# Altium PCB Fast_Servo.PCBDOC (part 2 of 11)
Units mm, origin at the board's own origin, x right, y up, seen from the top; angles counter-clockwise.
Board outline 162.48 x 100 mm, 6 copper layers (Top, GP1(GND), L3, L4, P3V3, Bot), stack 1.716 mm thick; 668 components, 491 nets, 2308 pads, 1133 vias.
Unrouted connection lines stored in the file: 2.
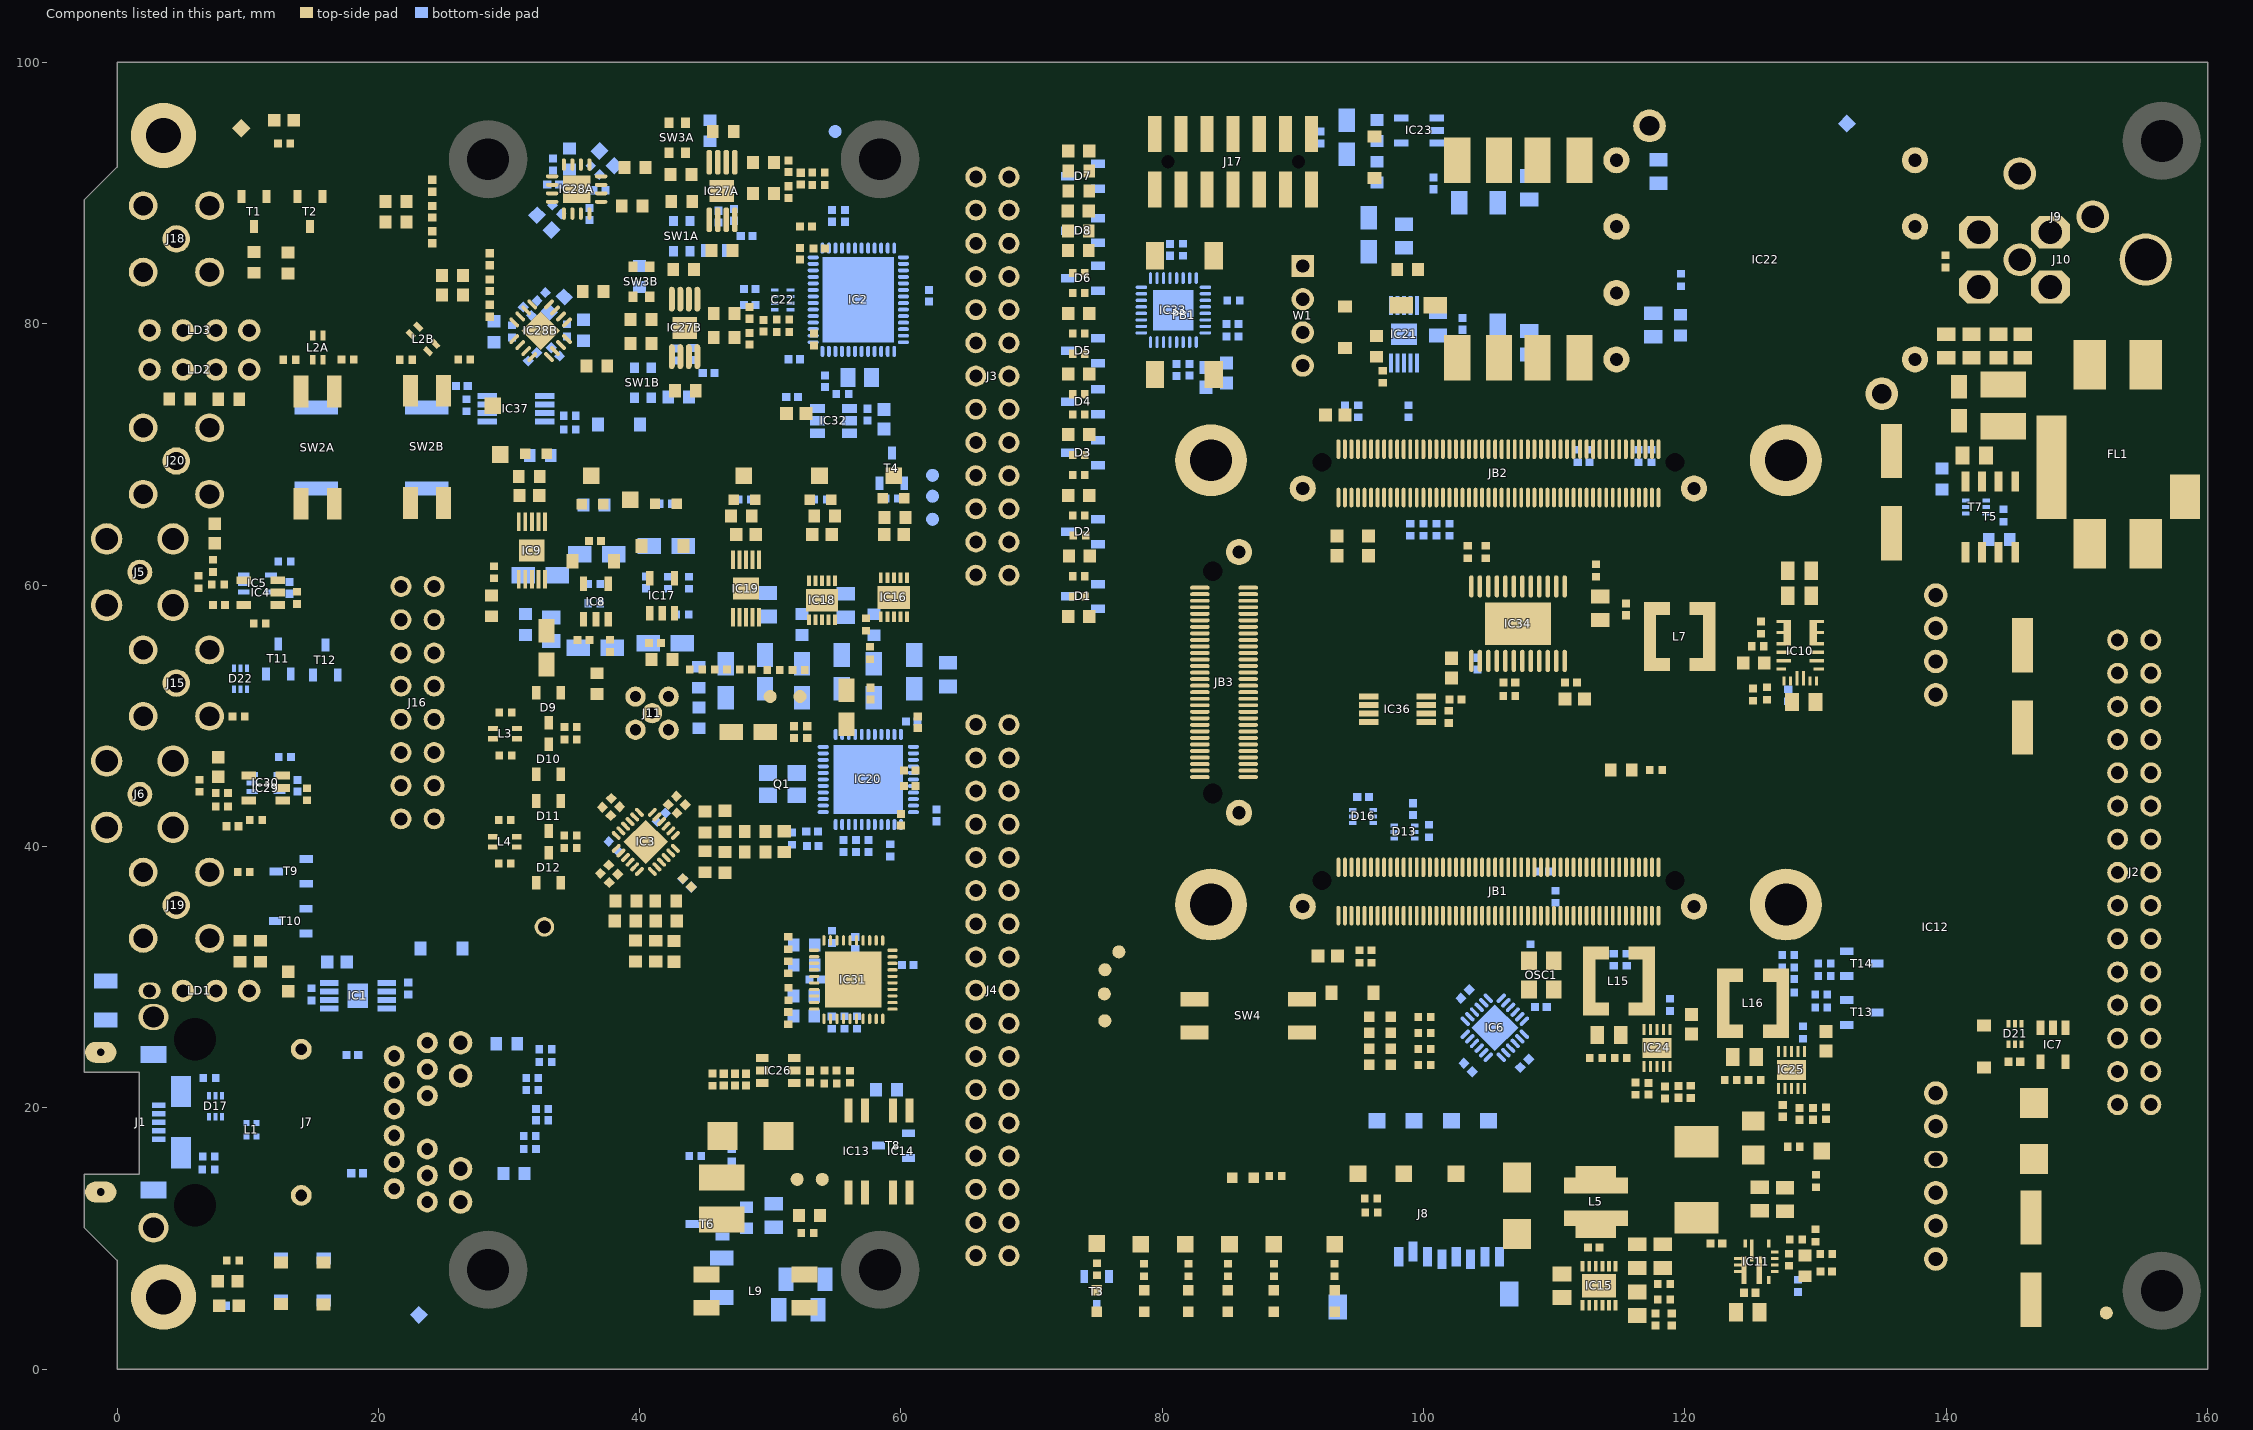
[diagram p6: the components of this part, seen from the top]

## Components (designator, comment, footprint, x,y, rotation, side; value= is the part's Value field where it differs from the comment) (continued)
R148 "20k" RESC1005X40N 47.045,16.358 r270 bottom locked
R149 "10" RESC1005X40N 44.25,16.3 r180 bottom locked
R150 "82k" RESC1608X55N 48.184,11.582 r90 bottom locked
R151 "1k" RESC1005X40N 144.367,65.325 r270 bottom
R152 "10k" RESC1005X40N 101,64.239 r270 bottom locked
R153 "82k" RESC1608X55N 139.672,68.12 r270 bottom
R154 "33k2" RESC1608X55N 144.057,63.5 r180 bottom
R155 "10k" RESC1005X40N 95.1,31.572 r270 top locked
R156 "DNP" RESC1005X40N 96.02,31.579 r90 top locked value=10k
R157 "10k" RESC1005X40N 100.4,41.186 r90 bottom
R158 "1k" RESC1005X40N 100.065,23.276 r0 top locked
R159 "1k" RESC1005X40N 100.065,24.496 r0 top locked
R160 "33" RESC1005X40N 108.175,32.057 r90 bottom locked
R161 "1k" RESC1005X40N 100.065,25.716 r0 top locked
R162 "1k" RESC1005X40N 100.065,26.935 r0 top locked
R164 "18k" RESC1608X55N 57.923,56.968 r270 bottom locked
R165 "10k" RESC1005X40N 43.274,57.737 r180 bottom locked
R166 "62k" RESC1005X40N 42.174,60.185 r90 bottom locked
R167 "20k" RESC1005X40N 43.774,60.185 r270 bottom locked
R169 "33k2" RESC1608X55N 52.422,56.988 r270 bottom locked
R171 "24k9" RESC1608X55N 44.52,52.953 r270 bottom
R172 "10" RESC1005X40N 59.176,39.702 r270 bottom locked
R173 "4k7" RESC1005X40N 93.978,73.306 r270 bottom locked
R174 "4k7" RESC1005X40N 95,73.306 r270 bottom locked
R175 "120k" RESC1608X55N 98.775,84.15 r180 top locked
R176 "Undefined" RESC1608X55N 119.649,79.899 r270 bottom locked
R177 "10k" RESC1005X40N 98.85,73.306 r270 bottom locked
R178 "0" RESC1005X40N 139.95,84.78 r90 top locked
R179 "36k" RESC1005X40N 119.7,83.356 r270 bottom locked
R180 "24k" RESC1608X55N 96.415,94.794 r90 bottom locked
R181 "2k7" RESC1608X55N 96.415,91.61 r90 bottom locked
R182 "20k" RESC1005X40N 115.091,23.803 r180 top
R183 "200k" RESC1005X40N 118.397,5.32 r0 top
R184 "2k" RESC1005X40N 101.975,64.237 r270 bottom locked
R185 "DNP" RESC1005X40N 115.55,31.332 r270 bottom locked value=0
R186 "0" RESC1005X40N 114.55,31.332 r90 bottom locked
R187 "4k7" RESC1005X40N 120.444,21.219 r270 top
R188 "0" RESC1005X40N 129.035,25.753 r270 bottom
R189 "0" RESC1005X40N 9.31,49.96 r180 top
R190 "0" RESC1005X40N 9.698,38.04 r180 top
R191 "24k9" RESC1608X55N 44.532,49.842 r270 bottom
R192 "200k" RESC1005X40N 130.434,28.658 r0 bottom
R193 "49R9" RESC1005X40N 110.1,36.15 r270 bottom
R194 "33" RESC1005X40N 31.775,21.367 r180 bottom
R195 "33" RESC1005X40N 31.775,22.275 r180 bottom
R196 "33" RESC1005X40N 32.535,19.901 r180 bottom
R197 "33" RESC1005X40N 32.535,19.042 r180 bottom
R198 "33" RESC1005X40N 31.595,16.85 r180 bottom
R199 "33" RESC1005X40N 31.59,17.839 r180 bottom
R200 "10k" RESC1005X40N 116.218,21.465 r90 top
R201A "31R6" RESC1608X55N 49.475,89.987 r0 top (schematic designator R201)
R201B "31R6" RESC1608X55N 46.465,78.957 r0 top (schematic designator R201)
R202 "39k" RESC1005X40N 123.51,22.118 r180 top
R203A "31R6" RESC1608X55N 49.475,92.362 r0 top (schematic designator R203)
R203B "31R6" RESC1608X55N 46.465,80.793 r0 top (schematic designator R203)
R204 "36k" RESC1005X40N 125.335,22.118 r180 top
R205 "10k" RESC1005X40N 128.327,17.015 r0 top
R206 "4k7" RESC1005X40N 130.785,19.581 r270 top
R207 "49R9" RESC1005X40N 130.007,10.225 r90 top
R208 "82k" RESC1608X55N 129.179,7.9 r90 top
R209 "Undefined" RESC1608X55N 115.125,45.856 r180 top
R210 "0" RESC1005X40N 117.787,45.856 r180 top
R211 "200k" RESC1005X40N 130.685,31.031 r0 bottom
R212 "2k4" RESC1005X40N 44.32,53.553 r0 top
R213 "20k" RESC1005X40N 46.212,53.527 r0 top
R214 "10k" RESC1005X40N 48.117,53.527 r0 top
R215 "2k4" RESC1005X40N 50.236,53.497 r0 top
R216 "20k" RESC1005X40N 52.166,53.497 r0 top
R217 "2k4" RESC1005X40N 57.324,56.982 r270 top
R218 "10k" RESC1005X40N 57.634,54.805 r270 top
R219 "4k7" RESC1005X40N 28.85,60.989 r270 top
R220 "24k9" RESC1608X55N 28.677,58.411 r270 top
R221 "10k" RESC1005X40N 127.907,29.85 r0 bottom
R222 "10k" RESC1005X40N 127.907,30.721 r0 bottom
R223 "2k4" RESC1005X40N 96.868,75.95 r90 top
R224 "82k" RESC1608X55N 96.393,78.276 r90 top
R225 "49R9" RESC1005X40N 51.669,40.595 r270 bottom
R226 "10k" RESC1005X40N 34.65,71.899 r0 bottom
R227 "0" RESC1005X40N 96.013,11.983 r180 top
R228 "0" RESC1005X40N 34.65,72.966 r0 bottom
R229 "0" RESC1005X40N 95.975,13.049 r180 top
R230 "0" RESC1005X40N 101.923,49.92 r90 top
R231 "0" RESC1005X40N 26.75,73.766 r270 bottom
ST1 "SCHROFF_PANEL_3U_4HP-Stabilizer" "SCHROFF_PANEL_3HP_4U - STABILIZER" 3.556,5.512 r0 top locked
SW1A "AQY221N3M" PANASONIC_AQY22(SON) 43.227,86.717 r90 bottom locked (schematic designator SW1)
SW1B "AQY221N3M" PANASONIC_AQY22(SON) 40.249,75.497 r90 bottom locked (schematic designator SW1)
SW2A "Switch" SW_CTS_204-121ST 15.356,70.531 r270 top locked (schematic designator SW2)
SW2B "Switch" SW_CTS_204-121ST 23.725,70.575 r270 top locked (schematic designator SW2)
SW3A "AQY221N3M" PANASONIC_AQY22(SON) 42.874,94.225 r270 top (schematic designator SW3)
SW3B "AQY221N3M" PANASONIC_AQY22(SON) 40.139,83.214 r270 top (schematic designator SW3)
SW4 "Switch" SW_OMRON_A6SN-2101 86.582,27.027 r0 top locked
T1 "BSH103" SOT95P230X110-3N 10.488,88.581 r270 top locked
T2 "BSH103" SOT95P230X110-3N 14.775,88.581 r270 top locked
T3 "BSH103" SOT95P230X110-3N 74.982,5.933 r270 bottom locked
T4 "BSH103" SOT95P230X110-3N 59.305,68.946 r90 bottom locked
T5 "SI4425DDY-T1-GE3" SOIC127P600X175-8N 143.37,65.225 r270 top
T6 "FDN86246" SOT95P237X112-3N 45.187,11.093 r180 bottom locked
T7 "BC857BV" SOTFL50P160X60-6N 142.275,65.975 r180 bottom
T8 "BSH103" SOT95P230X110-3N 59.425,17.102 r180 bottom
T9 "BSH103" SOT95P230X110-3N 13.335,38.092 r180 bottom
T10 "BSH103" SOT95P230X110-3N 13.3,34.284 r180 bottom
T11 "BSH103" SOT95P230X110-3N 12.346,54.353 r90 bottom
T12 "BSH103" SOT95P230X110-3N 15.95,54.262 r90 bottom
T13 "BSH103" SOT95P230X110-3N 133.535,27.293 r0 bottom
T14 "BSH103" SOT95P230X110-3N 133.535,31.031 r0 bottom
TP1 "Test Point" TPS127 88.529,9.565 r0 top locked
TP2 "Test Point" TPS127 47.978,68.38 r90 top locked
TP3 "Test Point" TPS127 29.344,70 r90 top locked
TP4 "Test Point" TPS127 53.761,68.38 r90 top locked
TP5 "Test Point" TPS127 81.754,9.565 r0 top locked
TP6 "Test Point" TPS127 74.979,9.61 r0 top locked
TP7 "Test Point" TPS127 78.366,9.565 r0 top locked
TP8 "Test Point" TPS127 36.302,68.38 r0 top locked
TP9 "Test Point" TPS127 39.278,66.541 r90 top locked
TP10 "Test Point" TPS127 85.142,9.565 r90 top locked
TP11 "Test Point" TPS127 59.458,68.38 r90 top locked
TP12 "Test Point" TPS127 28.752,73.727 r90 top locked
TP13 "Test Point" TPS127 94.975,14.956 r90 top
TP14 "Plated Hole" c150h100 32.705,33.844 r45 top
TP15 "Test Point" TPS127 98.475,14.956 r0 top
TP16 "Test Point" TPS127 102.475,14.956 r0 top
TP17 "Test Point" TPS127 93.185,9.565 r0 top locked
TP19 "Test Point" TPS127 130.475,16.695 r0 top
TP20 "SMD Pad" C100 49.988,51.475 r270 top locked
TP21 "SMD Pad" C100 52.272,51.475 r270 top locked
TP22 "SMD Pad" C100 75.566,28.714 r90 top
TP23 "SMD Pad" C100 75.614,30.564 r90 top
TP24 "SMD Pad" C100 76.678,31.93 r90 top
TP25 "SMD Pad" C100 62.415,65.04 r90 bottom
TP26 "SMD Pad" C100 54.963,94.721 r90 bottom
TP27 "SMD Pad" C100 62.415,68.404 r90 bottom
TP28 "SMD Pad" C100 62.415,66.804 r90 bottom
TP29 "SMD Pad" C100 75.6,26.656 r90 top
W1 "Header 4" SAMTEC_HTSW-104-23-L-S 90.75,84.42 r270 top locked
WASHER2 "D11.1xd6.6" Keystone_7687 -4.3,69.275 r180 top
WASHER4 "D11.1xd6.6" Keystone_7687 -4.325,52.5 r180 top
WASHER6 "D11.1xd6.6" Keystone_7687 -4.95,35.45 r180 top
WASHER8 "D11.1xd6.6" Keystone_7687 -4.55,86.225 r180 top

## Footprints (in the part's own frame and the unit in brackets; to place one, negate y for a bottom-side part, rotate by r counter-clockwise, add the part's x,y. Pads: shape width x height; smd on the part's side, far side on the other; paste and mask are expansions set on the pad)
3M_N2516-6002RB [mm] "16 Contacts - Straight .100\" x .100\" Low Profile Four-Wall Header"
  round 1.6 hole 1: 1(-8.89,-1.27) 2(-8.89,1.27) 3(-6.35,-1.27) 4(-6.35,1.27) 5(-3.81,-1.27) 6(-3.81,1.27) 7(-1.27,-1.27) 8(-1.27,1.27) 9(1.27,-1.27) 10(1.27,1.27) 11(3.81,-1.27) 12(3.81,1.27) 13(6.35,-1.27) 14(6.35,1.27) 15(8.89,-1.27) 16(8.89,1.27)
  silkscreen extent -13.82,-4.85 13.82,4.52, body extent -13.82,-4.17 13.82,4.52, height 9.65
3M_N2526-6002RB [mm] "26 Contacts - Straight .100\" x .100\" Low Profile Four-Wall Header"
  round 1.6 hole 1: 1(-15.24,-1.27) 2(-15.24,1.27) 3(-12.7,-1.27) 4(-12.7,1.27) 5(-10.16,-1.27) 6(-10.16,1.27) 7(-7.62,-1.27) 8(-7.62,1.27) 9(-5.08,-1.27) 10(-5.08,1.27) 11(-2.54,-1.27) 12(-2.54,1.27) 13(0,-1.27) 14(0,1.27) 15(2.54,-1.27) 16(2.54,1.27) 17(5.08,-1.27) 18(5.08,1.27) 19(7.62,-1.27) 20(7.62,1.27) 21(10.16,-1.27) 22(10.16,1.27) 23(12.7,-1.27) 24(12.7,1.27) 25(15.24,-1.27) 26(15.24,1.27)
  silkscreen extent -20.17,-4.85 20.17,4.52, body extent -20.17,-4.11 20.17,4.52, height 9.91
3M_N2530-6002RB [mm] "30 Contacts - Straight .100\" x .100\" Low Profile Four-Wall Header"
  round 1.6 hole 1: 1(-17.78,-1.27) 2(-17.78,1.27) 3(-15.24,-1.27) 4(-15.24,1.27) 5(-12.7,-1.27) 6(-12.7,1.27) 7(-10.16,-1.27) 8(-10.16,1.27) 9(-7.62,-1.27) 10(-7.62,1.27) 11(-5.08,-1.27) 12(-5.08,1.27) 13(-2.54,-1.27) 14(-2.54,1.27) 15(0,-1.27) 16(0,1.27) 17(2.54,-1.27) 18(2.54,1.27) 19(5.08,-1.27) 20(5.08,1.27) 21(7.62,-1.27) 22(7.62,1.27) 23(10.16,-1.27) 24(10.16,1.27) 25(12.7,-1.27) 26(12.7,1.27) 27(15.24,-1.27) 28(15.24,1.27) 29(17.78,-1.27) 30(17.78,1.27)
  silkscreen extent -22.71,-4.85 22.71,4.52, body extent -22.71,-4.11 22.71,4.52, height 9.91
3M_N2534-6002RB [mm] "34 Contacts - Straight .100\" x .100\" Low Profile Four-Wall Header"
  round 1.6 hole 1: 1(-20.32,-1.27) 2(-20.32,1.27) 3(-17.78,-1.27) 4(-17.78,1.27) 5(-15.24,-1.27) 6(-15.24,1.27) 7(-12.7,-1.27) 8(-12.7,1.27) 9(-10.16,-1.27) 10(-10.16,1.27) 11(-7.62,-1.27) 12(-7.62,1.27) 13(-5.08,-1.27) 14(-5.08,1.27) 15(-2.54,-1.27) 16(-2.54,1.27) 17(0,-1.27) 18(0,1.27) 19(2.54,-1.27) 20(2.54,1.27) 21(5.08,-1.27) 22(5.08,1.27) 23(7.62,-1.27) 24(7.62,1.27) 25(10.16,-1.27) 26(10.16,1.27) 27(12.7,-1.27) 28(12.7,1.27) 29(15.24,-1.27) 30(15.24,1.27) 31(17.78,-1.27) 32(17.78,1.27) 33(20.32,-1.27) 34(20.32,1.27)
  silkscreen extent -25.25,-4.85 25.25,4.52, body extent -25.25,-4.11 25.25,4.52, height 9.91
ADI-UJ-6_M [mm] "SOT23, 6-Leads, Body 2.9x1.6mm, Pitch 0.95mm, IPC Low Density"
  rect 1.15x0.7 smd: 1(-1.225,0.95) 2(-1.225,0) 3(-1.225,-0.95) 4(1.225,-0.95) 5(1.225,0) 6(1.225,0.95)
  silkscreen extent -1.35,-1.45 0.25,1.97, body extent -0.8,-1.45 0.8,1.45, height 1
ADI-UJ-6_N [mm] "SOT23, 6-Leads, Body 2.9x1.6mm, Pitch 0.95mm, IPC Medium Density"
  rect 0.95x0.6 smd: 1(-1.225,0.95) 2(-1.225,0) 3(-1.225,-0.95) 4(1.225,-0.95) 5(1.225,0) 6(1.225,0.95)
  silkscreen extent -1.35,-1.45 0.35,1.92, body extent -0.8,-1.45 0.8,1.45, height 1
AMPHENOL_919-383J-51A [mm] "50 Ohm, RF Connector, MCX Right Angle PCB Receptacle Jack"
  round 1.9 hole 1.2: 1(0,0)
  round 2.4 hole 1.7: 2(-2.54,2.54) 2(-2.54,-2.54) 2(2.54,2.54) 2(2.54,-2.54)
  silkscreen extent -3,-3 6.5,3, body extent -3,-3 6.5,3, height 6
ATTEND_112A-TAAR-R03 [mm] "MicroSD Socket, Push-Push Type"
  rect 0.7x1.5 smd: 1(3.85,0) 2(2.75,0.4) 3(1.65,0) 4(0.55,-0.2) 5(-0.55,0) 6(-1.65,-0.2) 7(-2.75,0) 8(-3.85,0)
  rect 1.4x1.9 smd: 9(-4.6,-2.85) 9(8.53,-3.85)
  rect 1.3x1.2 smd: 9(-0.17,10.4) 9(5.53,10.4) 10(-3.02,10.4) 10(2.68,10.4)
  silkscreen extent -5.07,-4.5 8.93,10.7, body extent -5.07,-4.5 8.94,10.7, height 1.83
BEL_0826-1X1T-80-F [mm] "1 Port, Orange Green/Yellow LEDs, RJ45 1000BaseT, PoE, Gigabit MagJack® Connector Module"
  round 1.6 hole 0.9: 1(-5.075,1.27) 2(-3.045,1.27) 3(-1.015,1.27) 4(1.016,1.27) 5(3.048,1.27) 6(5.08,1.27) 7(-6.095,-1.27) 8(-4.065,-1.27) 9(-2.035,-1.27) 10(2.032,-1.27) 11(4.064,-1.27) 12(6.096,-1.27) 13(-5.59,8.38) 14(5.59,8.38)
  round 1.8 hole 1.1: 15(-6.096,-3.81) 16(-3.556,-3.81) 17(3.556,-3.81) 18(6.096,-3.81)
  round 2.3 hole 1.6: 19(-8.065,19.685)
  oval 2x2.3 hole 1.6: 20(8.065,19.685)
  round 1 hole 3.25 unplated mask+1.125: 21(-6.35,16.51) 22(6.35,16.51)
  silkscreen extent -9.06,-5.07 9.06,27.94, body extent -9.05,-5.06 9.05,27.94, height 14.51
C100 [mm] "1mm Diameter SMD Pad"
  round 1 smd paste-1: 1(0,0)
c150h100 [mm] "Plated Through Hole: Hole Dia.=1mm Pad Dia.=1.5mm, IPC-7251 Level C"
  round 1.5 hole 1: 1(0,0)
  silkscreen extent -1.1,-1.1 1.1,1.1
CAPAE830X620N [mm] "Capacitor, Aluminium Electrolytric, 8.3mm L X 8.3mm W X 6.2mm H, IPC Medium Density"
  rect 4.15x1.6 smd: 1(-3.15,0) 2(3.15,0)
  silkscreen extent -4.9,-4.15 4.15,4.15, body extent -4.75,-4.25 4.75,4.25, height 6.2
CAPC1005X55N [mm] "Capacitor, Non-Polarized, Chip; 1.00mm L X 0.50mm W X 0.70mm H, IPC Medium Density"
  rect 0.62x0.62 smd: 1(-0.45,0) 2(0.45,0)
  body extent -0.52,-0.27 0.53,0.28, height 0.55
CAPC1005X61N [mm] "Capacitor, Non-Polarized, Chip; 1.02mm L X 0.51mm W X 0.61mm H, IPC Medium Density"
  rect 0.65x0.65 smd: 1(-0.46,0) 2(0.46,0)
  body extent -0.56,-0.3 0.56,0.31, height 0.61
CAPC1608X80N [mm] "Chip Capacitor, Body 1.6x0.8mm IPC Medium Density"
  rect 1x1 smd: 1(-0.75,0) 2(0.75,0)
  body extent -0.87,-0.47 0.88,0.48, height 0.8
CAPC1608X87N [mm] "Chip Capacitor, Body 1.6x0.8mm IPC Medium Density"
  rect 0.95x1 smd: 1(-0.8,0) 2(0.8,0)
  body extent -0.87,-0.47 0.88,0.48, height 0.87
CAPC1608X90N [mm] "Chip Capacitor, Body 1.6x0.8mm IPC Medium Density"
  rect 0.95x0.95 smd: 1(-0.75,0) 2(0.75,0)
  body extent -0.85,-0.45 0.85,0.45, height 0.9
CAPC1709X95N [mm] "Capacitor, non-Polarized, Chip; 1.65mm L X 0.85mm W X 0.95mm H,IPC Medium Density"
  rect 0.95x1 smd: 1(-0.75,0) 2(0.75,0)
  body extent -0.87,-0.47 0.88,0.48, height 0.95
CAPC2012X135N [mm] "Chip Capacitor, Body 2.0x1.25mm, IPC Medium Density"
  rect 1.05x1.4 smd: 1(-0.9,0) 2(0.9,0)
  silkscreen extent 0,-0.57 0,0.57, body extent -1.05,-0.67 1.05,0.68, height 1.25
CAPC2012X140N [mm] "Chip Capacitor, Body 2.0x1.25mm, IPC Medium Density"
  rect 1.15x1.45 smd: 1(-0.9,0) 2(0.9,0)
  silkscreen extent 0,-0.58 0,0.58, body extent -1.05,-0.67 1.05,0.68, height 1.3
CAPC3216X140N [mm] "Chip Capacitor, Body 3.2x1.6mm, IPC Medium Density"
  rect 1.15x1.8 smd: 1(-1.5,0) 2(1.5,0)
  silkscreen extent -0.5,-0.9 0.5,0.9, body extent -1.7,-0.9 1.7,0.9, height 1.4
CAPC3216X180N [mm] "Chip Capacitor, Body 3.2x1.6mm, IPC Medium Density"
  rect 1.15x1.8 smd: 1(-1.5,0) 2(1.5,0)
  silkscreen extent -0.55,-0.8 0.55,0.8, body extent -1.7,-0.9 1.7,0.9, height 1.8
CAPCAF50P125X200X95-8N [mm] "Capacitor,non-polarized,Chip Array,0.50mm pitch;8 pin,1.25mm W X 2.00mm L X 0.95mm H, IPC Medium Density"
  rect 0.6x0.25 smd: 1(-0.6,0.75) 2(-0.6,0.25) 3(-0.6,-0.25) 4(-0.6,-0.75) 5(0.6,-0.75) 6(0.6,-0.25) 7(0.6,0.25) 8(0.6,0.75)
  silkscreen extent -1.63,-1.1 0,1.1, body extent -0.7,-1.07 0.7,1.08, height 0.95
CAPMP3216X180N [mm] "Capacitor, Polarized, Molded  Body 3.2x1.6mm, IPC Medium Density"
  rect 1.8x1.25 smd: 1(-1.3,0) 2(1.3,0)
  silkscreen extent -2.4,-0.7 0,1.25, body extent -1.7,-0.9 1.7,0.9, height 1.6
CC6-1212DF-E [mm]
  round 2 hole 1: 1(-2.54,-2.63) 2(-2.54,-12.79) 3(-2.54,-17.87) 4(20.32,-17.87) 5(20.32,-12.79) 6(20.32,-7.71) 7(20.32,-2.63)
  round 2.5 hole 1.5: 8(0,0) 9(17.78,-20.5)
  silkscreen extent -4.06,-20.83 20.44,0.25, body extent -2.72,-20.81 20.44,0.29, height 8.4
CP-16-4_N [mm] "QFN, 16-Leads, Body 4x4mm, Pitch 0.65mm, Thermal Pad 2.1x2.1mm, IPC Medium Density"
  oval 0.95x0.3 smd: 1(-1.875,0.975) 2(-1.875,0.325) 3(-1.875,-0.325) 4(-1.875,-0.975) 9(1.875,-0.975) 10(1.875,-0.325) 11(1.875,0.325) 12(1.875,0.975)
  oval 0.3x0.95 smd: 5(-0.975,-1.875) 6(-0.325,-1.875) 7(0.325,-1.875) 8(0.975,-1.875) 13(0.975,1.875) 14(0.325,1.875) 15(-0.325,1.875) 16(-0.975,1.875)
  rect 2.1x2.1 smd: 17(0,0)
  silkscreen extent -2.92,-2.15 2.15,2.15, body extent -2,-2 2,2, height 1
CP-32-2_N [mm] "QFN, 32-Leads, Body 5x5mm, Pitch 0.5mm, Thermal Pad 3.1x3.1mm, IPC Medium Density"
  oval 0.9x0.25 smd: 1(-2.45,1.75) 2(-2.45,1.25) 3(-2.45,0.75) 4(-2.45,0.25) 5(-2.45,-0.25) 6(-2.45,-0.75) 7(-2.45,-1.25) 8(-2.45,-1.75) 17(2.45,-1.75) 18(2.45,-1.25) 19(2.45,-0.75) 20(2.45,-0.25) 21(2.45,0.25) 22(2.45,0.75) 23(2.45,1.25) 24(2.45,1.75)
  oval 0.25x0.9 smd: 9(-1.75,-2.45) 10(-1.25,-2.45) 11(-0.75,-2.45) 12(-0.25,-2.45) 13(0.25,-2.45) 14(0.75,-2.45) 15(1.25,-2.45) 16(1.75,-2.45) 25(1.75,2.45) 26(1.25,2.45) 27(0.75,2.45) 28(0.25,2.45) 29(-0.25,2.45) 30(-0.75,2.45) 31(-1.25,2.45) 32(-1.75,2.45)
  rect 3.1x3.1 smd: 33(0,0)
  silkscreen extent -3.47,-2.7 2.7,2.7, body extent -2.55,-2.55 2.55,2.55, height 1
CP-40-1_N [mm] "QFN, 40-Leads, Body 6x6mm, Pitch 0.5mm, Thermal Pad 4.3x4.3mm, IPC Medium Density"
  oval 0.8x0.25 smd: 1(-3,2.25) 2(-3,1.75) 3(-3,1.25) 4(-3,0.75) 5(-3,0.25) 6(-3,-0.25) 7(-3,-0.75) 8(-3,-1.25) 9(-3,-1.75) 10(-3,-2.25) 21(3,-2.25) 22(3,-1.75) 23(3,-1.25) 24(3,-0.75) 25(3,-0.25) 26(3,0.25) 27(3,0.75) 28(3,1.25) 29(3,1.75) 30(3,2.25)
  oval 0.25x0.8 smd: 11(-2.25,-3) 12(-1.75,-3) 13(-1.25,-3) 14(-0.75,-3) 15(-0.25,-3) 16(0.25,-3) 17(0.75,-3) 18(1.25,-3) 19(1.75,-3) 20(2.25,-3) 31(2.25,3) 32(1.75,3) 33(1.25,3) 34(0.75,3) 35(0.25,3) 36(-0.25,3) 37(-0.75,3) 38(-1.25,3) 39(-1.75,3) 40(-2.25,3)
  rect 4.3x4.3 smd: 41(0,0)
  silkscreen extent -4,-3.22 3.23,3.22, body extent -3.08,-3.07 3.08,3.08, height 1
DELOCK_65848 [mm] "50 Ohm Through Hole SMA Right Angle PCB Jack"
  round 2.1 hole 1.4: 1(0,0)
  round 2.2 hole 1.5: 2(-2.54,2.54) 2(-2.54,-2.54) 2(2.54,2.54) 2(2.54,-2.54)
  silkscreen extent -3,-5.1 19.1,5.1, body extent -3.04,-3.17 18.96,3.09, height 9.15
DIOM5336X265N [mm] "DO-214-AA/SMB Diode, Molded Body; 5.34mm L X 3.625mm W X 2.65mm H, IPC Medium Density"
  rect 2.3x2.15 smd: 1(-2.15,0) 2(2.15,0)
  silkscreen extent -3.92,-1.8 2.65,1.8, body extent -2.7,-1.95 2.7,1.95, height 2.4
FIDUCIAL_TOP_C100-200 [mm] "Round Fiducial Target, Top Layer, 1.0mm, Top Solder 2.0mm, Keepout =2.0mm"
  round 1 smd paste-0.51 mask+0.5: FTG2(0,0)
  Top keep-out circle w0.1: c0,0 r1
FIDUCIAL_TOP_S100-200 [mm] "Square Fiducial Target, Top Layer, 1.0mm, Top Solder 2.0mm, Keepout =2.0mm"
  rect 1x1 smd rot 45 paste-0.51 mask+0.5: 1(0,0)
  Top keep-out region: 1.414,0 0,-1.414 -1.414,0 0,1.414
FIL_MURATA_BNX02 [mm] "Block Type EMIFIL LC Combined Type, BNX02* Series"
  rect 3.8x2.5 smd: 1(-6.85,2.1) 2(6.85,2.1) 3(-6.85,-2.2) 4(6.85,-2.2)
  rect 7.9x2.3 smd: 4(1,-5.1)
  rect 3.4x2.3 smd: 4(3.25,5.1)
  silkscreen extent -5.95,-4.45 7.77,5.05, body extent -6.05,-4.55 6.05,4.55, height 3.1
IND_MURATA-PS_8400 [mm] "Miniature Surface Mount Power Inductors, 4.5mm L X 3.3mm W X 2.9mm H, MURATA 8400 Series"
  rect 2x3.5 smd: 1(-1.6,0) 2(1.6,0)
  silkscreen extent -0.3,-1.8 0.3,1.8, body extent -2.4,-1.8 2.4,1.8, height 2.9
IND_TDK_ACM2012 [mm] "Common Mode Filters, 2.00mm L X 1.25mm W X 1.30mm H, TDK ACM2012 Series"
  rect 0.75x0.4 smd mask+0.051: 1(-0.925,0.4) 2(-0.925,-0.4) 3(0.925,-0.4) 4(0.925,0.4)
  silkscreen extent -0.2,-0.6 0.2,0.6, body extent -1,-0.6 1,0.6, height 1.3
IND_TDK_VLCF5020-1 [mm] "SMD Inductor, 5mm L X 5mm W X 2mm H, TDK VLCF5020-1 Case"
  rect 0.9x3.1 smd: 1(-2.3,0) 2(2.3,0)
  rect 1.2x4.9 smd: 1(-1.25,0) 2(1.25,0)
  Top region: -2.75,-1.55 -1.85,-2.45 -0.65,-2.45 -0.65,2.45 -1.85,2.45 -2.75,1.55
  Top region: 2.75,1.55 1.85,2.45 0.65,2.45 0.65,-2.45 1.85,-2.45 2.75,-1.55
  silkscreen extent -0.35,-2.6 0.35,2.6, body extent -2.6,-2.6 2.6,2.6, height 2
IND_WURTH_WE-CNSW_0504 [mm] "Common Mode SMD Line Filter, Body 1.2x1.4mm"
  rect 0.45x0.45 smd: 1(-0.525,0.375) 2(0.525,0.375) 3(0.525,-0.375) 4(-0.525,-0.375)
  silkscreen extent -1.15,0.8 -0.95,1, body extent -0.6,-0.5 0.6,0.5, height 0.89
IND_WURTH_WE-SL2 [mm] "Common Mode SMD Line Filter WE-SL2"
  rect 2x1.2 smd: 1(-3.75,1.27) 2(-3.75,-1.27) 3(3.75,-1.27) 4(3.75,1.27)
  silkscreen extent -4.75,-3.15 4.75,3.15, body extent -4.75,-3.15 4.75,3.15, height 5.3
IND_WURTH_WE-TPC_4828 [mm] "Shielded Tiny Power Inductor, Body 4.8x4.8mm"
  rect 0.95x5.3 smd: 1(-2.275,0) 2(2.275,0)
  rect 1.05x1.014 smd: 1(-1.275,2.143) 1(-1.275,-2.143) 2(1.275,2.143) 2(1.275,-2.143)
  Top region: 0.75,-2.65 2.75,-2.65 2.75,2.65 0.75,2.65 0.75,1.636 1.394,1.138 1.753,0.407 1.753,-0.407 1.394,-1.138 0.75,-1.636 0.75,-1.636
  Top region: -2.75,-2.65 -0.75,-2.65 -0.75,-1.636 -1.394,-1.138 -1.753,-0.407 -1.753,0.407 -1.394,1.138 -0.75,1.636 -0.75,1.636 -0.75,2.65 -2.75,2.65
  Top region: 2.75,-2.65 0.75,-2.65 0.75,-1.636 1.394,-1.138 1.753,-0.407 1.753,0.407 1.394,1.138 0.75,1.636 0.75,1.636 0.75,2.65 2.75,2.65
  silkscreen extent -0.35,-2.4 0.35,2.4, body extent -2.4,-2.4 2.4,2.4, height 2.8
INDC1608X75N [mm] "Chip Inductor, 2-Leads, EIA 0603, Metric 1608, Body 1.6x0.8mm, IPC Medium Density"
  rect 0.9x1 smd: 1(-0.8,0) 2(0.8,0)
  body extent -0.87,-0.47 0.88,0.48, height 0.7
INDM6965X300N [mm] "Inductor Molded Body, Body 6.86mm L X 6.47mm W X 3mm H, IPC Medium Density"
  rect 2.4x3.4 smd: 1(-2.9,0) 2(2.9,0)
  silkscreen extent -3.4,-3.25 3.4,3.25, body extent -3.62,-3.36 3.62,3.36, height 3
Keystone_7687 [mm]
  silkscreen extent -0.8,-5.6 0.8,5.6
LED_DIALIGHT_571-0112F#1 [mm] "2x 2mm LED (Top: Red, Bot: Green) PCB Edge Mounting (Without positioning pins) DIALIGHT 571 Serie"
  oval 1.7x1.27 hole 1: 1(0,0)
  round 1.7 hole 1: 2(2.54,0) 3(5.08,0) 4(7.62,0)
  silkscreen extent -6.55,-1.24 8.89,1.24, body extent -6.55,-1.24 8.89,1.24, height 8.61
LED_DIALIGHT_571-0112F#2 [mm] "2x 2mm LED (Top: Red, Bot: Green) PCB Edge Mounting (Without positioning pins) DIALIGHT 571 Serie"
  round 1.7 hole 1: 1(0,0) 2(2.54,0) 3(5.08,0) 4(7.62,0)
  silkscreen extent -6.55,-1.24 8.89,1.24, body extent -6.55,-1.24 8.89,1.24, height 8.61
LED_DIALIGHT_571-0122F [mm] "2x 2mm LED (Top: Green, Bot: Green) PCB Edge Mounting (Without positioning pins) DIALIGHT 571 Serie"
  round 1.7 hole 1: 1(0,0) 2(2.54,0) 3(5.08,0) 4(7.62,0)
  silkscreen extent -6.55,-1.24 8.89,1.24, body extent -6.55,-1.24 8.89,1.24, height 8.61
LED_KINGBRIGHT_KPH-1608CGCK [mm] "SMT Green LED, Case 0603, Body L 1.6 x W 0.8mm H 0.65mm"
  rect 0.8x0.8 smd: 1(-0.825,0) 2(0.825,0)
  silkscreen extent -1.82,-0.4 0.07,0.4, body extent -0.8,-0.4 0.8,0.4, height 0.65
LSHM-130-04.0-X-DV-A-S-K-TR [mm]
  oval 0.3x1.5 smd: 1(-7.25,1.85) 2(-7.25,-1.85) 3(-6.75,1.85) 4(-6.75,-1.85) 5(-6.25,1.85) 6(-6.25,-1.85) 7(-5.75,1.85) 8(-5.75,-1.85) 9(-5.25,1.85) 10(-5.25,-1.85) 11(-4.75,1.85) 12(-4.75,-1.85) 13(-4.25,1.85) 14(-4.25,-1.85) 15(-3.75,1.85) 16(-3.75,-1.85) 17(-3.25,1.85) 18(-3.25,-1.85) 19(-2.75,1.85) 20(-2.75,-1.85) 21(-2.25,1.85) 22(-2.25,-1.85) 23(-1.75,1.85) 24(-1.75,-1.85) 25(-1.25,1.85) 26(-1.25,-1.85) 27(-0.75,1.85) 28(-0.75,-1.85) 29(-0.25,1.85) 30(-0.25,-1.85) 31(0.25,1.85) 32(0.25,-1.85) 33(0.75,1.85) 34(0.75,-1.85) 35(1.25,1.85) 36(1.25,-1.85) 37(1.75,1.85) 38(1.75,-1.85) 39(2.25,1.85) 40(2.25,-1.85) 41(2.75,1.85) 42(2.75,-1.85) 43(3.25,1.85) 44(3.25,-1.85) 45(3.75,1.85) 46(3.75,-1.85) 47(4.25,1.85) 48(4.25,-1.85) 49(4.75,1.85) 50(4.75,-1.85) 51(5.25,1.85) 52(5.25,-1.85) 53(5.75,1.85) 54(5.75,-1.85) 55(6.25,1.85) 56(6.25,-1.85) 57(6.75,1.85) 58(6.75,-1.85) 59(7.25,1.85) 60(7.25,-1.85)
  round 2 hole 1: F1(-9.975,-1.15) F2(9.975,-1.15)
  round 0 hole 1.5 unplated mask+0.75: H1(-8.5,0.85) H2(8.5,0.85)
  TopPaste keep-out region: -10.95,-1.15 -10.95,-1.056 -10.913,-0.873 -10.842,-0.7 -10.738,-0.544 -10.606,-0.412 -10.45,-0.308 -10.277,-0.237 -10.094,-0.2 -10,-0.2 -10,-0.2 -9.95,-0.2 -9.856,-0.2 -9.673,-0.237 -9.5,-0.308 -9.344,-0.412 -9.212,-0.544 -9.108,-0.7 -9.037,-0.873 -9,-1.056 -9,-1.15 -9,-1.244 -9.037,-1.427 -9.108,-1.6 -9.212,-1.756 -9.344,-1.888 -9.5,-1.992 -9.673,-2.063 -9.856,-2.1 -9.95,-2.1 -9.95,-2.1 -10,-2.1 -10.094,-2.1 -10.277,-2.063 -10.45,-1.992 -10.606,-1.888 -10.738,-1.756 -10.842,-1.6 -10.913,-1.427 -10.95,-1.244 -10.95,-1.15
  TopPaste keep-out region: 9,-1.15 9,-1.056 9.037,-0.873 9.108,-0.7 9.212,-0.544 9.344,-0.412 9.5,-0.308 9.673,-0.237 9.856,-0.2 9.95,-0.2 9.95,-0.2 10,-0.2 10.094,-0.2 10.277,-0.237 10.45,-0.308 10.606,-0.412 10.738,-0.544 10.842,-0.7 10.913,-0.873 10.95,-1.056 10.95,-1.15 10.95,-1.244 10.913,-1.427 10.842,-1.6 10.738,-1.756 10.606,-1.888 10.45,-1.992 10.277,-2.063 10.094,-2.1 10,-2.1 10,-2.1 9.95,-2.1 9.856,-2.1 9.673,-2.063 9.5,-1.992 9.344,-1.888 9.212,-1.756 9.108,-1.6 9.037,-1.427 9,-1.244 9,-1.15
  silkscreen extent -10.07,-2.49 10.07,2.8, body extent -10.4,-2.5 10.45,2.48, height 5.58
LSHM-150-XXX-X-DV-A-X [mm]
  oval 0.3x1.5 smd: 1(-12.25,1.85) 2(-12.25,-1.85) 3(-11.75,1.85) 4(-11.75,-1.85) 5(-11.25,1.85) 6(-11.25,-1.85) 7(-10.75,1.85) 8(-10.75,-1.85) 9(-10.25,1.85) 10(-10.25,-1.85) 11(-9.75,1.85) 12(-9.75,-1.85) 13(-9.25,1.85) 14(-9.25,-1.85) 15(-8.75,1.85) 16(-8.75,-1.85) 17(-8.25,1.85) 18(-8.25,-1.85) 19(-7.75,1.85) 20(-7.75,-1.85) 21(-7.25,1.85) 22(-7.25,-1.85) 23(-6.75,1.85) 24(-6.75,-1.85) 25(-6.25,1.85) 26(-6.25,-1.85) 27(-5.75,1.85) 28(-5.75,-1.85) 29(-5.25,1.85) 30(-5.25,-1.85) 31(-4.75,1.85) 32(-4.75,-1.85) 33(-4.25,1.85) 34(-4.25,-1.85) 35(-3.75,1.85) 36(-3.75,-1.85) 37(-3.25,1.85) 38(-3.25,-1.85) 39(-2.75,1.85) 40(-2.75,-1.85) 41(-2.25,1.85) 42(-2.25,-1.85) 43(-1.75,1.85) 44(-1.75,-1.85) 45(-1.25,1.85) 46(-1.25,-1.85) 47(-0.75,1.85) 48(-0.75,-1.85) 49(-0.25,1.85) 50(-0.25,-1.85) 51(0.25,1.85) 52(0.25,-1.85) 53(0.75,1.85) 54(0.75,-1.85) 55(1.25,1.85) 56(1.25,-1.85) 57(1.75,1.85) 58(1.75,-1.85) 59(2.25,1.85) 60(2.25,-1.85) 61(2.75,1.85) 62(2.75,-1.85) 63(3.25,1.85) 64(3.25,-1.85) 65(3.75,1.85) 66(3.75,-1.85) 67(4.25,1.85) 68(4.25,-1.85) 69(4.75,1.85) 70(4.75,-1.85) 71(5.25,1.85) 72(5.25,-1.85) 73(5.75,1.85) 74(5.75,-1.85) 75(6.25,1.85) 76(6.25,-1.85) 77(6.75,1.85) 78(6.75,-1.85) 79(7.25,1.85) 80(7.25,-1.85) 81(7.75,1.85) 82(7.75,-1.85) 83(8.25,1.85) 84(8.25,-1.85) 85(8.75,1.85) 86(8.75,-1.85) 87(9.25,1.85) 88(9.25,-1.85) 89(9.75,1.85) 90(9.75,-1.85) 91(10.25,1.85) 92(10.25,-1.85) 93(10.75,1.85) 94(10.75,-1.85) 95(11.25,1.85) 96(11.25,-1.85) 97(11.75,1.85) 98(11.75,-1.85) 99(12.25,1.85) 100(12.25,-1.85)
  round 2 hole 1: F1(-14.975,-1.15) F2(14.975,-1.15)
  round 0 hole 1.45 unplated: H1(13.5,0.85) H2(-13.5,0.85)
  TopPaste keep-out region: 13.975,-1.1 13.975,-1.006 14.012,-0.823 14.083,-0.65 14.187,-0.494 14.319,-0.362 14.475,-0.258 14.648,-0.187 14.831,-0.15 14.925,-0.15 14.925,-0.15 15,-0.15 15.096,-0.15 15.284,-0.187 15.462,-0.261 15.622,-0.368 15.757,-0.503 15.864,-0.663 15.938,-0.841 15.975,-1.029 15.975,-1.125 15.975,-1.125 15.975,-1.2 15.975,-1.294 15.938,-1.477 15.867,-1.65 15.763,-1.806 15.631,-1.938 15.475,-2.042 15.302,-2.113 15.119,-2.15 15.025,-2.15 15.025,-2.15 14.975,-2.15 14.877,-2.15 14.683,-2.112 14.501,-2.036 14.338,-1.927 14.198,-1.787 14.089,-1.624 14.013,-1.442 13.975,-1.248 13.975,-1.15 13.975,-1.15
  TopPaste keep-out region: -15.975,-1.1 -15.975,-1.006 -15.938,-0.823 -15.867,-0.65 -15.763,-0.494 -15.631,-0.362 -15.475,-0.258 -15.302,-0.187 -15.119,-0.15 -15.025,-0.15 -15.025,-0.15 -14.95,-0.15 -14.854,-0.15 -14.666,-0.187 -14.488,-0.261 -14.328,-0.368 -14.193,-0.503 -14.086,-0.663 -14.012,-0.841 -13.975,-1.029 -13.975,-1.125 -13.975,-1.125 -13.975,-1.2 -13.975,-1.294 -14.012,-1.477 -14.083,-1.65 -14.187,-1.806 -14.319,-1.938 -14.475,-2.042 -14.648,-2.113 -14.831,-2.15 -14.925,-2.15 -14.925,-2.15 -14.975,-2.15 -15.073,-2.15 -15.267,-2.112 -15.449,-2.036 -15.612,-1.927 -15.752,-1.787 -15.861,-1.624 -15.937,-1.442 -15.975,-1.248 -15.975,-1.15 -15.975,-1.15
  silkscreen extent -15.08,-2.49 15.07,2.8, body extent -15.42,-2.49 15.42,2.49, height 5.45
LT-MS8E-8-EDP_M [mm] "SOP, 8-Leads, Body 3x3mm, Pitch 0.65mm, Thermal Pad 1.88x1.68mm, IPC Low Density"
  oval 1.9x0.45 smd: 1(-2.2,0.975) 2(-2.2,0.325) 3(-2.2,-0.325) 4(-2.2,-0.975) 5(2.2,-0.975) 6(2.2,-0.325) 7(2.2,0.325) 8(2.2,0.975)
  rect 1.68x1.88 smd: 9(0,0)
  silkscreen extent -2.32,-1.55 0.85,1.87, body extent -1.55,-1.55 1.55,1.55, height 1.1
MOLEX_87832-1420 [mm] "Milli-Grid, Pitch 2mm, 14 contacts, Surface Mount Vertical Header With Locking Window And Centre Polarization Slot"
  rect 1x2.75 smd: 1(-6,-2.125) 2(-6,2.125) 3(-4,-2.125) 4(-4,2.125) 5(-2,-2.125) 6(-2,2.125) 7(0,-2.125) 8(0,2.125) 9(2,-2.125) 10(2,2.125) 11(4,-2.125) 12(4,2.125) 13(6,-2.125) 14(6,2.125)
  round 0.5 hole 1 unplated mask+0.25: 15(-5,0) 16(5,0)
  silkscreen extent -8.33,-4.19 8.32,3.15, body extent -8.32,-3.15 8.33,3.15, height 7.6
MPS_MPM38XXGQV [mm] "MPS QFN-20 Case, 0.50mm Pitch, Rect. ; 18 Pin, 3.00mm L X 5.00mm W X 1.65mm H body, (w/Thermal Tab x2)"
  rect 0.8x0.25 smd: 1(-1.4,1.55)
  rect 1.1x0.25 smd: 2(-1.25,0.9) 3(-1.25,0.25) 10(1.25,0.25) 11(1.25,0.9)
  rect 0.6x0.25 smd: 4(-1.5,-0.4) 5(-1.5,-1.25) 6(-1.5,-2.1) 7(1.5,-2.1) 8(1.5,-1.25) 9(1.5,-0.4)
  rect 0.6x1.95 smd: 5(-1,-1.25) 8(1,-1.25)
  rect 0.7x0.25 smd: 12(1.45,1.55)
  rect 0.25x0.7 smd: 13(1.25,2.45) 14(0.75,2.45) 17(-0.75,2.45) 18(-1.25,2.45)
  rect 0.25x1.1 smd: 15(0.25,2.25) 16(-0.25,2.25)
  Top keep-out region: -0.575,0.97 0.575,0.97 0.575,0.18 -0.575,0.18
  silkscreen extent -2.43,-2.5 0.35,2.12, body extent -1.5,-2.5 1.5,2.5, height 1.65
MRX56904CV [mm]
  oct 2.5x3 hole 1.8: 1(0,0) 2(-4.2,0) 3(0,5.5) 4(-4.2,5.5)
  round 4 hole 3.2: 9(-2.1,-7.3)
  silkscreen extent -6.88,-13.94 3.16,5.99, body extent -6.88,-14.02 3.12,5.92, height 11.4
MTG320_550 [mm] "Plated Through Hole: Hole Dia.=3.2mm Pad Dia.=5.5mm"
  round 5.5 hole 3.2: 1(0,0)
OSC_CDFN3225-4LD-PL-1 [mm] "MICROCHIP Case CDFN3225-4LD-PL-1, SMD Oscillator, QFN, 4 pins, 3.2mm x 2.5mm"
  rect 1.2x1.4 smd: 1(-0.95,1.1) 2(-0.95,-1.1) 3(0.95,-1.1) 4(0.95,1.1)
  silkscreen extent -2.13,-1.6 1.25,1.6, body extent -1.25,-1.6 1.25,1.6, height 0.9
PANASONIC_AQY22(SON) [mm] "PANASONIC Serie AQY22(SON)  Small Outline No Lead, 4 pins, 2.2x2.95mm"
  rect 0.8x0.7 smd: 1(-1.15,0.635) 2(-1.15,-0.635) 3(1.15,-0.635) 4(1.15,0.635)
  silkscreen extent -2.35,-1.1 0.4,1.1, body extent -1.47,-1.1 1.48,1.1, height 1.4
PB_TYCO_FSM6JSMA [mm] "Body 6mm x 6mm, Surface Mount Tactile Switches, TYCO FSM6JSMA Series"
  rect 1.4x2.1 smd: 1(-2.25,4.55) 2(-2.25,-4.55) 3(2.25,4.55) 4(2.25,-4.55)
  silkscreen extent -3,-3 3,3, body extent -3,-5 3,5, height 7.11
QFN50P400X400X80-25N-S240 [mm] "QFN, 0.50mm Pitch, Square; 6 Pin X 6 Pin, 4mm X 4mm Body (w/Thermal tab 2.4 X 2.4 mm), IPC Medium Density"
  oval 0.85x0.3 smd: 1(-1.95,1.25) 2(-1.95,0.75) 3(-1.95,0.25) 4(-1.95,-0.25) 5(-1.95,-0.75) 6(-1.95,-1.25) 13(1.95,-1.25) 14(1.95,-0.75) 15(1.95,-0.25) 16(1.95,0.25) 17(1.95,0.75) 18(1.95,1.25)
  oval 0.3x0.85 smd: 7(-1.25,-1.95) 8(-0.75,-1.95) 9(-0.25,-1.95) 10(0.25,-1.95) 11(0.75,-1.95) 12(1.25,-1.95) 19(1.25,1.95) 20(0.75,1.95) 21(0.25,1.95) 22(-0.25,1.95) 23(-0.75,1.95) 24(-1.25,1.95)
  rect 2.4x2.4 smd: 25(0,0)
  silkscreen extent -3.07,-2 2,2, body extent -2.07,-2.07 2.08,2.08, height 0.8
QFN50P400X400X80-25N-S255 [mm] "QFN, 0.50mm Pitch, Square; 6 Pin X 6 Pin, 4mm X 4mm Body (w/Thermal Tab 2.55 X 2.55 mm), IPC Medium Density"
  oval 0.9x0.3 smd: 1(-1.95,1.25) 2(-1.95,0.75) 3(-1.95,0.25) 4(-1.95,-0.25) 5(-1.95,-0.75) 6(-1.95,-1.25) 13(1.95,-1.25) 14(1.95,-0.75) 15(1.95,-0.25) 16(1.95,0.25) 17(1.95,0.75) 18(1.95,1.25)
  oval 0.3x0.9 smd: 7(-1.25,-1.95) 8(-0.75,-1.95) 9(-0.25,-1.95) 10(0.25,-1.95) 11(0.75,-1.95) 12(1.25,-1.95) 19(1.25,1.95) 20(0.75,1.95) 21(0.25,1.95) 22(-0.25,1.95) 23(-0.75,1.95) 24(-1.25,1.95)
  rect 2.55x2.55 smd: 25(0,0)
  silkscreen extent -3.12,-2 2,2, body extent -2.07,-2.07 2.08,2.08, height 0.8
QFN50P700X700X90-45N-S530 [mm] "QFN,0.50mm Pitch, Square; 44 Pin, 7.00mm L X 7.00mm W X 0.90mm H Body (W/Thermal Tab 5.3mm X 5.3mm), IPC Medium Density"
  oval 0.85x0.3 smd: 1(-3.45,2.5) 2(-3.45,2) 3(-3.45,1.5) 4(-3.45,1) 5(-3.45,0.5) 6(-3.45,0) 7(-3.45,-0.5) 8(-3.45,-1) 9(-3.45,-1.5) 10(-3.45,-2) 11(-3.45,-2.5) 23(3.45,-2.5) 24(3.45,-2) 25(3.45,-1.5) 26(3.45,-1) 27(3.45,-0.5) 28(3.45,0) 29(3.45,0.5) 30(3.45,1) 31(3.45,1.5) 32(3.45,2) 33(3.45,2.5)
  oval 0.3x0.85 smd: 12(-2.5,-3.45) 13(-2,-3.45) 14(-1.5,-3.45) 15(-1,-3.45) 16(-0.5,-3.45) 17(0,-3.45) 18(0.5,-3.45) 19(1,-3.45) 20(1.5,-3.45) 21(2,-3.45) 22(2.5,-3.45) 34(2.5,3.45) 35(2,3.45) 36(1.5,3.45) 37(1,3.45) 38(0.5,3.45) 39(0,3.45) 40(-0.5,3.45) 41(-1,3.45) 42(-1.5,3.45) 43(-2,3.45) 44(-2.5,3.45)
  rect 5.3x5.3 smd: 45(0,0)
  silkscreen extent -4.57,-3.5 3.5,3.5, body extent -3.5,-3.5 3.5,3.5, height 0.9
QFN50P700X800X80-53N-R655X550 [mm] "QFP, 0.50mm pitch, square; 12 pin X 14 pin, 7.00mm X 8.00mm, IPC Medium Density"
  oval 0.85x0.3 smd: 1(-3.45,3.25) 2(-3.45,2.75) 3(-3.45,2.25) 4(-3.45,1.75) 5(-3.45,1.25) 6(-3.45,0.75) 7(-3.45,0.25) 8(-3.45,-0.25) 9(-3.45,-0.75) 10(-3.45,-1.25) 11(-3.45,-1.75) 12(-3.45,-2.25) 13(-3.45,-2.75) 14(-3.45,-3.25) 27(3.45,-3.25) 28(3.45,-2.75) 29(3.45,-2.25) 30(3.45,-1.75) 31(3.45,-1.25) 32(3.45,-0.75) 33(3.45,-0.25) 34(3.45,0.25) 35(3.45,0.75) 36(3.45,1.25) 37(3.45,1.75) 38(3.45,2.25) 39(3.45,2.75) 40(3.45,3.25)
  oval 0.3x0.85 smd: 15(-2.75,-3.95) 16(-2.25,-3.95) 17(-1.75,-3.95) 18(-1.25,-3.95) 19(-0.75,-3.95) 20(-0.25,-3.95) 21(0.25,-3.95) 22(0.75,-3.95) 23(1.25,-3.95) 24(1.75,-3.95) 25(2.25,-3.95) 26(2.75,-3.95) 41(2.75,3.95) 42(2.25,3.95) 43(1.75,3.95) 44(1.25,3.95) 45(0.75,3.95) 46(0.25,3.95) 47(-0.25,3.95) 48(-0.75,3.95) 49(-1.25,3.95) 50(-1.75,3.95) 51(-2.25,3.95) 52(-2.75,3.95)
  rect 5.5x6.55 smd: 53(0,0)
  silkscreen extent -4.57,-4 3.5,4, body extent -3.55,-4.05 3.55,4.05, height 0.8
RE-24_N [mm] "TSOP, 24-Leads, Body 7.8x4.4mm, Pitch 0.65mm, Thermal pad 5.02x3.25 mm, IPC Medium Density"
  oval 1.7x0.35 smd: 1(-2.85,3.575) 2(-2.85,2.925) 3(-2.85,2.275) 4(-2.85,1.625) 5(-2.85,0.975) 6(-2.85,0.325) 7(-2.85,-0.325) 8(-2.85,-0.975) 9(-2.85,-1.625) 10(-2.85,-2.275) 11(-2.85,-2.925) 12(-2.85,-3.575) 13(2.85,-3.575) 14(2.85,-2.925) 15(2.85,-2.275) 16(2.85,-1.625) 17(2.85,-0.975) 18(2.85,-0.325) 19(2.85,0.325) 20(2.85,0.975) 21(2.85,1.625) 22(2.85,2.275) 23(2.85,2.925) 24(2.85,3.575)
  rect 3.25x5.02 smd: 25(0,0)
  silkscreen extent -2.97,-3.95 1.6,4.43, body extent -2.25,-3.95 2.25,3.95, height 1.2
RESC1005X35N [mm] "Chip Resistor, EIA 0402, Metric 1005, Body 1.0x0.5mm, IPC Medium Density"
  rect 0.58x0.62 smd: 1(-0.47,0) 2(0.47,0)
  body extent -0.52,-0.27 0.53,0.28, height 0.35
RESC1005X40N [mm] "Chip Resistor, EIA 0402, Metric 1005, Body 1.0x0.5mm, IPC Medium Density"
  rect 0.58x0.62 smd: 1(-0.47,0) 2(0.47,0)
  body extent -0.52,-0.27 0.53,0.28, height 0.4
RESC1608X55N [mm] "Chip Resistor, EIA 0603, Metric 1608, Body 1.6x0.8mm, IPC Medium Density"
  rect 0.9x1 smd: 1(-0.8,0) 2(0.8,0)
  body extent -0.87,-0.47 0.88,0.48, height 0.55
RESC3116X80N [mm] "Chip Resistor, EIA 1206, Metric 3116, Body 3.1x1.55mm, IPC Medium Density"
  rect 1.45x1.7 smd: 1(-1.3,0) 2(1.3,0)
  silkscreen extent -0.2,-0.8 0.2,0.8, body extent -1.6,-0.85 1.6,0.85, height 0.8
RESC6331X70N [mm] "Chip Resistor, EIA 2512, Metric 6331, 2-Leads, Body 6.3x3.1mm, IPC Medium Density"
  rect 1.05x3.3 smd: 1(-3.1,0) 2(3.1,0)
  silkscreen extent -2.2,-1.65 2.2,1.65, body extent -3.25,-1.65 3.25,1.65, height 0.7
SAMTEC_HTSW-104-23-L-S [mm] "4 Contacts - Pitch 2.54mm - Single Row  Through Mount Straigh Header (Post Lead 5.84mm, Tail Lead 2.92mm, Insulator 2.54mm)"
  rect 1.7x1.7 hole 1: 1(0,0)
  round 1.7 hole 1: 2(2.54,0) 3(5.08,0) 4(7.62,0)
  silkscreen extent -1.27,-1.27 8.89,1.93, body extent -1.27,-1.27 8.89,1.27, height 8.38
SAMTEC_MMCX-J-P-H-ST-TH1 [mm] "Straight Through-hole 50 Ohm Micro Mini RF Jack, MMCX Serie"
  round 1.55 hole 0.85: 1(0,0) 2(-1.27,-1.27) 2(-1.27,1.27) 2(1.27,-1.27) 2(1.27,1.27)
  silkscreen extent -1.75,-1.75 1.75,1.75, body extent -1.75,-1.75 1.75,1.75, height 4.35
"SCHROFF_PANEL_3HP_4U - STABILIZER" [mm] "Schroff PCB 3HP 4U Eurocard Panel Kit"
  round 5 hole 2.7: 0(0,0) 1(0,88.9)
  silkscreen extent -6.1,-8.6 2.75,97.5, body extent -22.6,-19.75 3,108.65, height 16.94
SILVERTEL_AG5300 [mm] "Power-over-Ethernet Plus (POE+) Module, Body L 57.3mm x W 18mm x H 14mm"
  round 1.8 hole 1.1: 1(-25.406,0) 2(-22.866,0) 3(-20.326,0) 5(-15.246,0) 6(-12.706,0) 7(17.786,0) 8(20.326,0) 9(22.866,0) 10(25.406,0)
  oval 1.3x1.8 hole 1.1: 4(-17.786,0)
  silkscreen extent -30.52,-10.7 26.78,7.3, body extent -30.52,-10.7 26.78,7.3, height 14
SODFL3517X110N [mm] "SODFL Diode (SOD123W); 2.60mm W X 1.70mm L X 1.10mm H body, IPC Medium Density"
  rect 0.92x1.08 smd: 1(-1.6,0) 2(1.6,0)
  silkscreen extent -1.93,-0.85 0.75,1.16, body extent -1.85,-0.95 1.85,0.95, height 1.1
SOIC127P600X175-8N [mm] "SOIC 8, Pitch 1.27mm - Body 4x5mm, IPC Medium Density"
  rect 1.55x0.6 smd: 1(-2.7,1.905) 2(-2.7,0.635) 3(-2.7,-0.635) 4(-2.7,-1.905) 5(2.7,-1.905) 6(2.7,-0.635) 7(2.7,0.635) 8(2.7,1.905)
  silkscreen extent -2.52,-2.5 1.55,2.88, body extent -3.1,-2.5 3.1,2.5, height 1.75
SOIC127P700X242-4N [mm] "SOIC, 1.27mm, pitch; 4 pin, 2.60mm W X 4.40mm L X 2.42mm H body, IPC Medium Density"
  rect 1.85x0.6 smd: 1(-3.15,0.635) 2(-3.15,-0.635) 3(3.15,-0.635) 4(3.15,0.635)
  silkscreen extent -3.92,-1.3 1.9,1.58, body extent -3.5,-1.3 3.5,1.3, height 2.32
SON50P300X80_HS-11N [mm] "SON, 10-Leads, Body 3,00x3,00mm, Pitch 0,50mm, Thermal Pad 2,25x1,55mm, IPC Medium Density"
  rect 0.85x0.25 smd: 1(-1.42,1) 2(-1.42,0.5) 3(-1.42,0) 4(-1.42,-0.5) 5(-1.42,-1) 6(1.42,-1) 7(1.42,-0.5) 8(1.42,0) 9(1.42,0.5) 10(1.42,1)
  rect 1.55x2.25 smd: 11(0,0)
  silkscreen extent -2.15,-1.7 1.7,1.75, body extent -1.63,-1.55 1.63,1.55, height 0.8
SON50P300X300X80-11N-R175X248 [mm] "SON, 0.50mm Pitch; 10-pin, 3.00mm W  X 3.00mm L X 0.80mm H Body, (w/thermal tab 1.75 X 2.48 mm), IPC Medium Density"
  rect 0.8x0.3 smd: 1(-1.5,1) 2(-1.5,0.5) 3(-1.5,0) 4(-1.5,-0.5) 5(-1.5,-1) 6(1.5,-1) 7(1.5,-0.5) 8(1.5,0) 9(1.5,0.5) 10(1.5,1)
  rect 1.75x2.48 smd: 11(0,0)
  silkscreen extent -2.52,0.88 -2.28,1.13, body extent -1.5,-1.5 1.5,1.5, height 0.8
SON50P300X300X80-13N-R180X260 [mm] "SON, 0.50mm Pitch, 12-Pin, 3.00mm W  X 3.00mm L X 0.80mm Height, (w/Thermal Tab 1.8 X 2.6 mm), IPC Medium Density"
  rect 0.8x0.3 smd: 1(-1.5,1.25) 2(-1.5,0.75) 3(-1.5,0.25) 4(-1.5,-0.25) 5(-1.5,-0.75) 6(-1.5,-1.25) 7(1.5,-1.25) 8(1.5,-0.75) 9(1.5,-0.25) 10(1.5,0.25) 11(1.5,0.75) 12(1.5,1.25)
  rect 1.8x2.6 smd: 13(0,0)
  silkscreen extent -2.52,1.12 -2.28,1.37, body extent -1.55,-1.55 1.55,1.55, height 0.8
SOP50P490X110-11N-R168X198 [mm] "SOP, 0.50mm, Pitch; 10 pin, 3.00mm W X 3.00mm L X 1.10mm H body (w/thermal tab  1.68 X 1.98 mm), IPC Medium Density"
  rect 1.45x0.3 smd: 1(-2.2,1) 2(-2.2,0.5) 3(-2.2,0) 4(-2.2,-0.5) 5(-2.2,-1) 6(2.2,-1) 7(2.2,-0.5) 8(2.2,0) 9(2.2,0.5) 10(2.2,1)
  rect 1.68x1.98 smd: 11(0,0)
  silkscreen extent -2.77,-1.5 1.1,1.78, body extent -2.45,-1.55 2.45,1.55, height 1.1
SOP65P490X109-8N [mm] "SOP, 0.65mm pitch; 8 pin,3.00mm W X 3.00mm L X 1.09mm H bodyI, PC Medium Density"
  rect 1.5x0.45 smd: 1(-2.2,0.975) 2(-2.2,0.325) 3(-2.2,-0.325) 4(-2.2,-0.975) 5(2.2,-0.975) 6(2.2,-0.325) 7(2.2,0.325) 8(2.2,0.975)
  silkscreen extent -2.82,-1.5 1.12,1.82, body extent -2.45,-1.55 2.45,1.55, height 1.09
SOP65P490X110-9N-R157X189 [mm] "SOP,0.65mm,pitch; 8 pin,3.00mm W X 3.00mm L X 1.10mm H body (w/thermal tab 1.57 X 1.89 mm), IPC Medium Density"
  rect 1.45x0.45 smd: 1(-2.2,0.975) 2(-2.2,0.325) 3(-2.2,-0.325) 4(-2.2,-0.975) 5(2.2,-0.975) 6(2.2,-0.325) 7(2.2,0.325) 8(2.2,0.975)
  rect 1.57x1.89 smd: 9(0,0)
  silkscreen extent -2.78,-1.5 1.1,1.82, body extent -2.45,-1.47 2.45,1.48, height 1.1
SOT65P212X110-5N [mm] "SOT353, SOT, 0.65mm Pitch, 5 pin, 1.25mm W X 2.05mm L X 1.10mm H, IPC Medium Density"
  rect 0.9x0.4 smd: 1(-1.05,0.65) 2(-1.05,0) 3(-1.05,-0.65) 4(1.05,-0.65) 5(1.05,0.65)
  silkscreen extent -1.37,-1.05 0.28,1.47, body extent -1.2,-1.1 1.2,1.1, height 1.1
SOT95P230X110-3N [mm] "SOT23, 3 pin, Pitch 0.95mm - 1.3mm W X 2.9mm L X 1.1mm H, IPC Medium Density"
  rect 1x0.6 smd: 1(-1.15,0.95) 2(-1.15,-0.95) 3(1.15,0)
  silkscreen extent -1.52,-1.45 0.33,1.88, body extent -1.08,-1.5 1.25,1.5, height 1.1
SOT95P237X112-3N [mm] "SOT, 0.95mm, pitch; 3 pin,1.30mm W X 2.92mm L X 1.12mm H body, IPC Medium Density"
  rect 1.05x0.6 smd: 1(-1.15,0.95) 2(-1.15,-0.95) 3(1.15,0)
  silkscreen extent -1.53,-1.45 0.3,1.87, body extent -1.25,-1.5 1.25,1.5, height 1.1
SOT95P240X110-3N [mm] "SOT23 3-Leads, Pitch 0.95mm, Body 1.3x2.9mm, IPC Medium Density"
  rect 1.05x0.65 smd: 1(-1.15,0.95) 2(-1.15,-0.95) 3(1.15,0)
  silkscreen extent -1.53,-1.45 0.3,1.92, body extent -1.25,-1.5 1.25,1.5, height 1.1
SOT95P280X100-5N [mm] "SOT23, 0.95mm pitch; 5 pin, 1.625mm W X 2.9mm L, IPC Medium Density"
  rect 1.1x0.55 smd: 1(-1.35,0.95) 2(-1.35,0) 3(-1.35,-0.95) 4(1.35,-0.95) 5(1.35,0.95)
  silkscreen extent -1.77,-1.45 0.47,1.87, body extent -1.4,-1.5 1.4,1.5, height 1
SOT95P280X145-5N [mm] "SOT, 0.95mm pitch; 5 pin, 1.60mm W X 2.90mm L X 1.45mm H body, IPC Medium Density"
  rect 1.1x0.6 smd: 1(-1.3,0.95) 2(-1.3,0) 3(-1.3,-0.95) 4(1.3,-0.95) 5(1.3,0.95)
  silkscreen extent -1.73,-1.45 0.43,1.87, body extent -1.4,-1.5 1.4,1.5, height 1.45
SOTFL50P160X60-6N [mm] "SOTFL (SOT666), 0.50mm Pitch; 6 Pin, 1.20mm W X 1.60mm L X 0.60mm H body, IPC Medium Density"
  rect 0.57x0.3 smd: 1(-0.79,0.5) 2(-0.79,0) 3(-0.79,-0.5) 4(0.79,-0.5) 5(0.79,0) 6(0.79,0.5)
  silkscreen extent -1.22,-0.8 0,1.27, body extent -0.85,-0.85 0.85,0.85, height 0.6
SW_CTS_204-121ST [mm] "Body 7.26 x 9.78mm SPDT DIP Switch, 204 Series"
  rect 2.44x1.13 smd: 1(-4.3,1.27) 2(-4.3,-1.27) 3(4.3,-1.27) 4(4.3,1.27)
  silkscreen extent -6.1,-3.63 4.89,3.63, body extent -5.2,-3.63 5.2,3.63, height 9.76
SW_OMRON_A6SN-2101 [mm] "Pitch 2.54mm, Body 7x7.5, 2 Ways SPST Surface-Mounting Slide Switch With Flat Actuator (A6SN Series)"
  rect 2.15x1.1 smd: 1(-4.125,1.27) 2(-4.125,-1.27) 3(4.125,-1.27) 4(4.125,1.27)
  silkscreen extent -3.75,-3.76 3.75,3.76, body extent -4.65,-3.76 4.65,3.76, height 4.6
SWITCHCRAFT_L712RA [mm] "CONN PWR JACK 2.5X5.5MM SOLDER"
  round 2.5 hole 1.7: 1(-5.6,-3.3) 2(0,-6.6) 3(0,0)
  silkscreen extent -22,-7.72 -1.48,2.21, body extent -22,-8.84 1.35,2.18, height 13.9
TEXAS_RPA0010A [mm] "TEXAS Case Style RPA0010A, QFN, 0.50mm Pitch; 10 Pin, 3.00mm W X3.00mm L X 1.00mm H body"
  rect 0.6x0.25 smd: 1(-1.4,0.75) 2(-1.4,0.25) 3(-1.4,-0.25) 4(-1.4,-0.75)
  rect 0.25x0.6 smd: 5(-0.93,-1.4) 7(0.87,-1.4) 10(-0.93,1.4)
  rect 0.25x1.7 smd: 6(0.37,-0.85)
  rect 0.4x2.1 smd: 8(0.95,0.65) 9(-0.21,0.65)
  rect 0.56x0.25 smd: 8(1.43,0.75) 8(1.43,-0.25) 8(1.43,0.25)
  silkscreen extent -2.15,-1.5 1.5,1.5, body extent -1.5,-1.5 1.5,1.5, height 1
TPS127 [mm] "1.27 x  1.27mm SMD Test Point Area"
  rect 1.27x1.27 smd paste-1.27: 1(0,0)
  silkscreen extent -0.94,-0.94 0.93,0.94
UJ2-MIBH-4-MSMT [mm] "Micro USB mid mount"
  rect 0.4x1.05 smd: 1(-1.3,-4.7) 2(-0.65,-4.7) 3(0,-4.7) 4(0.65,-4.7) 5(1.3,-4.7)
  oval 1.6x2.4 hole 0.6 slot 1.3 at 90 deg: 6(5.35,-0.25) 7(-5.35,-0.25)
  rect 1.3x2 smd: 8(-5.2,-4.3) 9(5.2,-4.3)
  rect 2.4x1.5 smd: 10(-2.35,-6.4) 11(2.35,-6.4)
  silkscreen extent -4.32,-5.48 4.33,1.9, body extent -5.5,-6.8 5.5,1.9, height 0.9
XTAL_TXC_7M [mm] "4 Pins, 2.5x3.2mm, SMD Sealing Crystal, 7M Serie"
  rect 1.2x1.4 smd: 1(-0.85,1.1) 2(-0.85,-1.1) 3(0.85,-1.1) 4(0.85,1.1)
  body extent -1.25,-1.6 1.25,1.6, height 0.8

## Part data
B1 B2 TP20 TP21 TP22 TP23 TP24 TP25 TP26 TP27 TP28 TP29: library part SMD_PAD_D1MM, "Through Hole Pad", Author="CERN DEM JLC", ComponentHeight=0mm, Component Type="Standard (No BOM)", Family="SMD Pad", HelpURL=Undefined, Mounted=No, PackageDescription="1mm Diameter SMD Pad", Part Description="1mm Diameter SMD Pad", Part Number=SMD_PAD_D1MM, Pin Count=1, Sense=No, Socket=No, Status=None
  B1 B2: CreateDate=10.10.2017, LatestRevisionDate=10.10.2017, SMD=No
  TP20 TP21: CreateDate=10-Oct-17, LatestRevisionDate=10-Oct-17, SMD=No
  TP22 TP23 TP24 TP25 TP26 TP27 TP28 TP29: CreateDate=10/10/2017, LatestRevisionDate=10/10/2017, SMD=Yes
B3 B4 B5 B6: library part PLATED_HOLE3.2_PAD5.5, "Single Terminal Socket", Author="CERN DEM JMW", ComponentHeight=0mm, Component Type="Standard (No BOM)", CreateDate=01/10/2012, Family="Plated Hole", HelpURL=Undefined, LatestRevisionDate=01/10/2012, Mounted=No, PackageDescription="Plated Through Hole: Hole Dia.=3.2mm Pad Dia.=5.5mm", Part Description="Plated Through Hole: Hole Dia.=3.2mm Pad Dia.=5.5mm", Part Number=PLATED_HOLE3.2_PAD5.5, Pin Count=1, Sense=No, SMD=No, Socket=No, Status=None
C1 C4 C20 C21 C23 C24 C26 C27 C28 C29 C30 C31 C33 C35 C36 C50 C73 C75 C77 C78 C79 C80 C98 C115 C117 C121 C129 C158 C159 C160 C161 C189 C202 C203 C204 C205: library part CC0402_100NF_16V_10%_X5R, "Non-polarised capacitor", Case=0402, Manufacturer=GENERIC, Manufacturer1 ComponentHeight=0.55mm, Manufacturer1 Example=MURATA, Manufacturer1 Part Number=GRM155R61C104KA88D, Tolerance=±10%, Voltage=16V, Author="CERN DEM JLC", Component Type=Standard, HelpURL=\\cern.ch\dfs\Applications\Altium\Datasheets\CC0402_X5R_MURATA_GRM.pdf, Manufacturer Part Number=CC0402_100NF_16V_10%_X5R, Mounted=Yes, Part Description="SMD Multilayer Chip Ceramic Capacitor", Part Number=CC0402_100NF_16V_10%_X5R, Pin Count=2, Sense=No, SMD=Yes, Socket=No, Status=None, TC=X5R
  C1: CreateDate=10-Dec-13, LatestRevisionDate=10-Dec-13
  C4 C77 C129 C158 C159 C160 C161 C202 C203: CreateDate=10/12/2013, LatestRevisionDate=10/12/2013
  C20 C21 C23 C24 C26 C27 C28 C29 C30 C31 C33 C35 C36 C50 C73 C75 C78 C79 C80 C98 C115 C117 C121 C189 C204 C205: CreateDate=10.12.2013, LatestRevisionDate=10.12.2013
C2 C133 C141 C145 C197: library part CC0603_4.7UF_16V_10%_X5R, "Non-polarised capacitor", Case=0603, Manufacturer=GENERIC, Manufacturer1 ComponentHeight=0.95mm, Manufacturer1 Example="TAIYO YUDEN", Manufacturer1 Part Number=EMK107ABJ475KA-T, Tolerance=±10%, Voltage=16V, Author="CERN DEM JLC", Component Type=Standard, CreateDate=16-Dec-13, HelpURL=\\cern.ch\dfs\Applications\Altium\Datasheets\CC0603_X7R_TAIYO-YUDEN_HIGH-VALUE.pdf, LatestRevisionDate=16-Sep-14, Manufacturer Part Number=CC0603_4.7UF_16V_10%_X5R, Mounted=Yes, Part Description="SMD Multilayer Chip Ceramic Capacitor", Part Number=CC0603_4.7UF_16V_10%_X5R, Pin Count=2, Sense=No, SMD=Yes, Socket=No, Status=None, TC=X5R
C3: library part CC1206_100PF_2KV_5%_C0G, "Non-polarised capacitor", Case=1206, Manufacturer=GENERIC, Manufacturer1 ComponentHeight=1.8mm, Manufacturer1 Example=AVX, Manufacturer1 Part Number=1206GA101JAT2A, Tolerance=±5%, Voltage=2kV, Author="CERN DEM JLC", Component Type=Standard, CreateDate=17-May-17, HelpURL=\\cern.ch\dfs\Applications\Altium\Datasheets\CC1206_C0G_AVX_HV-MLC.pdf, LatestRevisionDate=17-May-17, Manufacturer Part Number=CC1206_100PF_2KV_5%_C0G, Mounted=Yes, Part Description="High Voltage MLC Chip Capacitor", Part Number=CC1206_100PF_2KV_5%_C0G, Pin Count=2, Sense=No, SMD=Yes, Socket=No, Status=None, TC=C0G/NP0
C5 C6 C84 C85 C99 C102 C137 C140 C149 C150 C151 C152 C153 C154 C156 C157 C170 C180 C183: library part CC0402_1UF_16V_10%_X5R, "Non-polarised capacitor", Case=0402, Manufacturer=GENERIC, Manufacturer1 ComponentHeight=0.55mm, Manufacturer1 Example=TDK, Manufacturer1 Part Number=C1005X5R1C105KT, Tolerance=±10%, Voltage=16V, Author="CERN DEM JLC", Component Type=Standard, HelpURL=\\cern.ch\dfs\Applications\Altium\Datasheets\CC0402_X5R_TDK_C.pdf, Manufacturer Part Number=CC0402_1UF_16V_10%_X5R, Mounted=Yes, Part Description="SMD Multilayer Chip Ceramic Capacitor", Part Number=CC0402_1UF_16V_10%_X5R, Pin Count=2, Sense=No, SMD=Yes, Socket=No, Status=Preferred, TC=X5R
  C5 C6 C99 C102 C137 C140 C170 C180 C183: CreateDate=25/10/2012, LatestRevisionDate=25/10/2012
  C84 C85: CreateDate=25.10.2012, LatestRevisionDate=25.10.2012
  C149 C150 C151 C152 C153 C154 C156 C157: CreateDate=25-Oct-12, LatestRevisionDate=25-Oct-12
C7 C8 C9 C10 C11 C37A C37B C38A C38B C46A C46B C48A C48B C51A C51B C52A C52B C56 C57 C58 C59 C60 C64 C65 C66 C67 C68 C70 C71 C87 C88 C90 C92 C94 C97 C190 C191: library part CC0402_100NF_16V_10%_X7R, "Non-polarised capacitor", Case=0402, Manufacturer=GENERIC, Manufacturer1 ComponentHeight=0.55mm, Manufacturer1 Example=MURATA, Manufacturer1 Part Number=GRM155R71C104KA88D, Tolerance=±10%, Voltage=16V, Author="CERN DEM JLC", Component Type=Standard, HelpURL=\\cern.ch\dfs\Applications\Altium\Datasheets\CC0402_X7R_MURATA_GRM.pdf, Manufacturer Part Number=CC0402_100NF_16V_10%_X7R, Mounted=Yes, Part Description="SMD Multilayer Chip Ceramic Capacitor", Part Number=CC0402_100NF_16V_10%_X7R, Pin Count=2, Sense=No, SMD=Yes, Socket=No, Status="Not Recommended", TC=X7R
  C7 C8 C9 C10 C11: CreateDate=05/12/2013, LatestRevisionDate=03/12/2007
  C37A C37B C38A C38B C46A C46B C48A C48B C51A C51B C52A C52B C56 C57 C58 C59 C60 C64 C65 C66 C67 C68 C87 C88 C90 C92 C94 C97: CreateDate=05-Dec-13, LatestRevisionDate=03-Dec-07
  C70 C71 C190 C191: CreateDate=05.12.2013, LatestRevisionDate=03.12.2007
C12 C13 C14 C15 C16 C17: library part CC0603_82PF_50V_5%_NP0, "Non-polarised capacitor", Case=0603, Manufacturer=GENERIC, Manufacturer1 ComponentHeight=0.87mm, Manufacturer1 Example=PHYCOMP, Manufacturer1 Part Number=223886715829, Tolerance=±5%, Voltage=50V, Author="CERN DEM JLC", Component Type=Standard, CreateDate=03.12.2007, HelpURL=\\cern.ch\dfs\Applications\Altium\Datasheets\CC0603_NP0_PHYCOMP.pdf, LatestRevisionDate=03.12.2007, Manufacturer Part Number=CC0603_82PF_50V_5%_NP0, Mounted=Yes, Part Description="SMD Multilayer Chip Ceramic Capacitor", Part Number=CC0603_82PF_50V_5%_NP0, Pin Count=2, Sense=No, SMD=Yes, Socket=No, Status=Preferred, TC=C0G/NP0
C18 C19 C54 C62: library part CC0603_330PF_50V_1%_NP0, "Non-polarised capacitor", Case=0603, Manufacturer=GENERIC, Manufacturer1 ComponentHeight=0.87mm, Manufacturer1 Example=PHYCOMP, Manufacturer1 Part Number=223886718331, Tolerance=±1%, Voltage=50V, Author="CERN DEM MR", Component Type=Standard, CreateDate=06.09.2017, HelpURL=\\cern.ch\dfs\Applications\Altium\Datasheets\CC0603_NP0_PHYCOMP.pdf, LatestRevisionDate=06.09.2017, Manufacturer Part Number=CC0603_330PF_50V_1%_NP0, Mounted=Yes, Part Description="SMD Multilayer Chip Ceramic Capacitor", Part Number=CC0603_330PF_50V_1%_NP0, Pin Count=2, Sense=No, SMD=Yes, Socket=No, Status=None, TC=C0G/NP0